# Altium PCB BOARD_2LAYER.PcbDoc (part 3 of 7)
Units mil, origin at the board's own origin, x right, y up, seen from the top; angles counter-clockwise.
Board outline 7677.17 x 7677.17 mil, 2 copper layers (Top Layer, Bottom Layer), stack 34.252 mil thick; 625 components, 375 nets, 1924 pads, 450 vias.
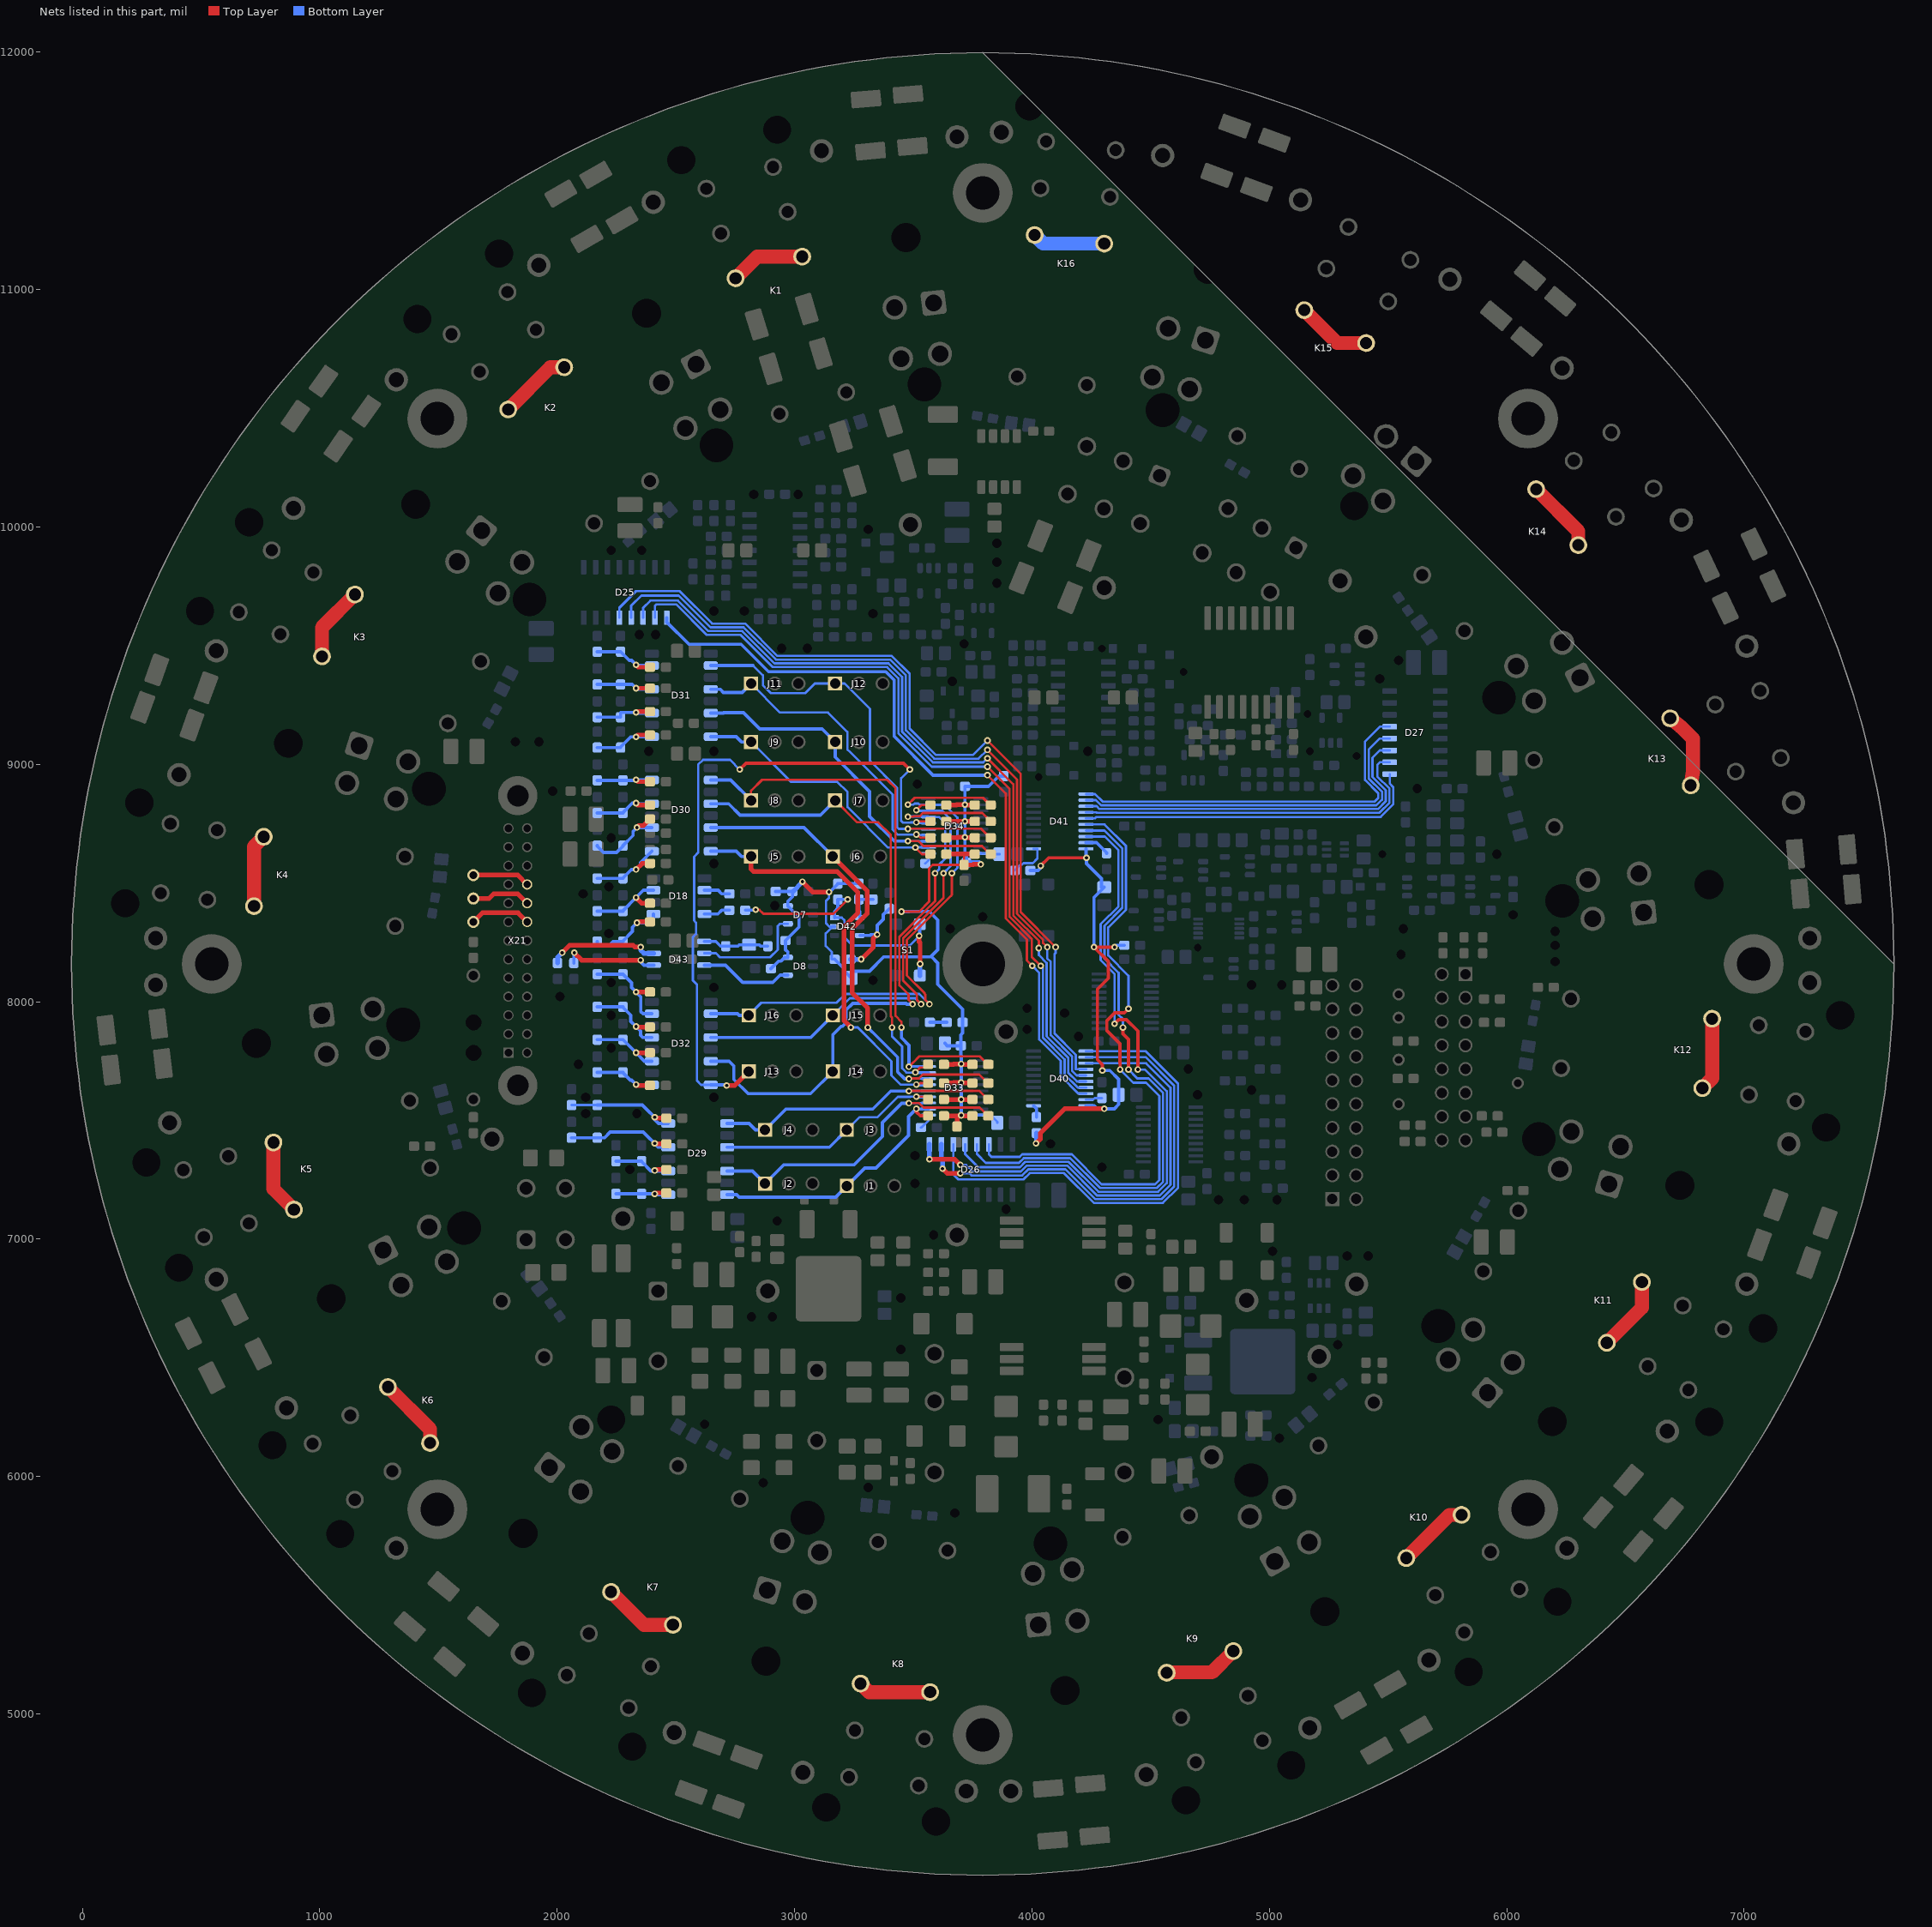
[diagram p3: the nets of this part, all layers, seen from the top]

## Components (designator, comment, footprint, x,y, rotation, side; value= is the part's Value field where it differs from the comment) (continued)
X2 "0039301040" 2Rx4K_ANGLE 2562.15,10551.18 r28 bottom locked
X3 "0039301040" 2Rx4K_ANGLE 1715.69,9852.36 r52 bottom locked
X4 "0039301040" 2Rx4K_ANGLE 1243.25,8966.54 r72 bottom locked
X5 "0039301040" 2Rx4K_ANGLE 1125.14,7874.02 r97 bottom locked
X6 "0039301040" 2Rx4K_ANGLE 1400.73,6929.13 r117 bottom locked
X7 "0039301040" 2Rx4K_ANGLE 2099.55,6072.83 r142 bottom locked
X8 "0039301040" 2Rx4K_ANGLE 2995.22,5600.39 r163 bottom locked
X9 "0039301040" 2Rx4K_ANGLE 4097.58,5492.13 r186 bottom locked
X10 "0039301040" 2Rx4K_ANGLE 5042.46,5777.56 r209 bottom locked
X11 "0039301040" 2Rx4K_ANGLE 5888.92,6486.22 r230 bottom locked
X12 "0039301040" 2Rx4K_ANGLE 6351.52,7342.52 r253 bottom locked
X13 "0039301040" 2Rx4K_ANGLE 6459.79,8444.88 r277 bottom locked
X14 "0039301040" 2Rx4K_ANGLE 6174.35,9389.76 r297 bottom locked
X15 "0039301040" 2Rx4K_ANGLE 5485.38,10246.06 r320 bottom locked
X16 "0039301040" 2Rx4K_ANGLE 4619.24,10708.66 r342 bottom locked
X17 "SBH11-PBPC-D10-ST-BK" IDS-20-V-2,54 5265.3,7168.9 r90 bottom
X18 "SBH11-PBPC-D08-ST-BK" IDS-16-V-2,54 5826.32,8116.54 r270 bottom locked
X19 "0039281063" 2Rx6K 4914.51,9901.57 r150 bottom locked
X20 "0039281063" 2Rx6K 4343.64,10177.17 r158 bottom
X21 "M80-5102642" M80-VERT-J-TEK-26 1833.8,8257.87 r270 bottom locked
X22 "0039281043" 2Rx4K 1951.91,7106.3 r0 bottom

## Footprints (in the part's own frame and the unit in brackets; to place one, negate y for a bottom-side part, rotate by r counter-clockwise, add the part's x,y. Pads: shape width x height; smd on the part's side, far side on the other; paste and mask are expansions set on the pad)
2Rx4K [mm]
  rrect39% 2x2 hole 1.4 paste-2539.97 mask+0.1: 1(-2.1,2.75)
  round 2 hole 1.4 paste-2539.97 mask+0.1: 2(2.1,2.75) 3(-2.1,-2.75) 4(2.1,-2.75)
  silkscreen extent -5,-6.25 5,4.9, body extent -5,-4.9 5,4.9, height 0.03
2Rx4K_ANGLE [mm]
  rrect28% 2.6x2.6 / inner rrect28% 2.8x2.8 / far side rrect30% 2.6x2.6 hole 1.8 paste-2539.97 mask+0.1: 1(2.1,-2.75)
  round 2.6 / inner round 2.8 / far side round 2.6 hole 1.8 paste-2539.97 mask+0.1: 2(-2.1,-2.75) 3(2.1,2.75) 4(-2.1,2.75)
  round 0 hole 3.1 unplated paste-2539.97 mask+0: ""(0,-10.05)
  silkscreen extent -5.05,-14.25 4.55,-3.8, body extent -5.05,-14.25 4.55,-3.8, height 0.03
2Rx6K [mm]
  rrect39% 2x2 hole 1.4 paste-2539.97 mask+0.1: 1(-4.2,2.75)
  round 2 hole 1.4 paste-2539.97 mask+0.1: 2(0,2.75) 3(4.2,2.75) 4(-4.2,-2.75) 5(0,-2.75) 6(4.2,-2.75)
  silkscreen extent -7.1,-6.25 7.1,4.9, body extent -7.1,-4.9 7.1,4.9, height 0.03
8-SOIC-VISHAY [mm]
  rrect44% 0.9x1.5 smd paste-0.05 mask+0.1: 1(-1.905,-2.73) 2(-0.635,-2.73) 3(0.635,-2.73) 4(1.905,-2.73) 5(1.905,2.73) 6(0.635,2.73) 7(-0.635,2.73) 8(-1.905,2.73)
  silkscreen extent -3.1,-4.6 3.1,2.1, body extent -3.1,-2.1 3.1,2.1, height 0.03
16-SOIC-7mm5W-Allegro [mm]
  rrect28% 0.7x2.5 smd paste-0.05 mask+0.1: 1(-4.445,-4.75) 2(-3.175,-4.75) 3(-1.905,-4.75) 4(-0.635,-4.75) 5(0.635,-4.75) 6(1.905,-4.75) 7(3.175,-4.75) 8(4.445,-4.75) 9(4.445,4.75) 10(3.175,4.75) 11(1.905,4.75) 12(0.635,4.75) 13(-0.635,4.75) 14(-1.905,4.75) 15(-3.175,4.75) 16(-4.445,4.75)
  silkscreen extent -6.31,-5.31 5.25,3.8, body extent -5.25,-3.8 5.25,3.8, height 0.03
16-SOIC-VISHAY [mm]
  rrect44% 0.9x1.5 smd paste-0.05 mask+0.1: 1(-4.445,-3.15) 2(-3.175,-3.15) 3(-1.905,-3.15) 4(-0.635,-3.15) 5(0.635,-3.15) 6(1.905,-3.15) 7(3.175,-3.15) 8(4.445,-3.15) 9(4.445,3.15) 10(3.175,3.15) 11(1.905,3.15) 12(0.635,3.15) 13(-0.635,3.15) 14(-1.905,3.15) 15(-3.175,3.15) 16(-4.445,3.15)
  silkscreen extent -6.7,-3.95 5.2,2.3, body extent -5.2,-2.3 5.2,2.3, height 0.03
0603-STANDART-1608 [mm]
  rrect40% 1.1x1 smd paste-0.05 mask+0.1: 1(-0.85,0) 2(0.85,0)
  silkscreen extent -0.85,-0.47 0.85,0.48, body extent -0.85,-0.47 0.85,0.48, height 0.03
0805-STANDART-2012 [mm]
  rrect30% 1.3x1.5 smd paste-0.05 mask+0.1: 1(-0.95,0) 2(0.95,0)
  silkscreen extent -1.08,-0.7 1.07,0.7, body extent -1.08,-0.7 1.07,0.7, height 0.03
0805-STANDART-2012-SVET [mm]
  rrect30% 1.3x1.5 smd paste-0.05 mask+0.1: 1(-0.95,0) 2(0.95,0)
  silkscreen extent -1.08,-0.75 2,0.75, body extent -1.08,-0.7 1.07,0.7, height 0.03
1206-STANDART-3216 [mm]
  rrect25% 1.6x1.8 smd paste-0.05 mask+0.1: 1(-1.4,0) 2(1.4,0)
  silkscreen extent -1.68,-0.88 1.67,0.87, body extent -1.68,-0.88 1.67,0.87, height 0.03
1210-STANDART-3225 [mm]
  rrect25% 1.6x2.7 smd paste-0.05 mask+0.1: 1(-1.4,0) 2(1.4,0)
  silkscreen extent -1.68,-1.32 1.67,1.32, body extent -1.68,-1.32 1.67,1.32, height 0.03
1808-STANDART-4520 [mm]
  rrect22% 1.75x2.3 smd paste-0.1 mask+0.1: 1(-2.3,0) 2(2.3,0)
  silkscreen extent -2.6,-1.1 2.6,1.1, body extent -2.6,-1.1 2.6,1.1, height 0.03
2512-STANDART-6332 [mm]
  rrect22% 1.8x3.2 smd paste-0.05 mask+0.1: 1(-2.8,0) 2(2.8,0)
  silkscreen extent -3.23,-1.7 3.22,1.7, body extent -3.23,-1.7 3.22,1.7, height 0.03
6540_SRP_SERIES_7t5x6t5_H4 [mm]
  rrect16% 2.4x4 smd paste-0.05 mask+0.1: 1(-2.775,0) 2(2.775,0)
  silkscreen extent -3.75,-3.35 3.75,3.35, body extent -3.75,-3.35 3.75,3.35, height 0.03
7914G [mm]
  rrect31% 1.27x1.27 smd paste-0.05 mask+0.1: 1(-2.75,-1.27) 2(2.75,-1.27) 3(2.75,1.27) 4(-2.75,1.27)
  silkscreen extent -2.25,-2.5 2.25,2.5, body extent -2.25,-2.5 2.25,2.5, height 0.03
CAP-EL-L7.5-D18,0 [mm]
  rrect39% 2x2 hole 1.4 paste-2539.97 mask+0.1: 1(-3.75,0)
  round 2 hole 1.4 paste-2539.97 mask+0.1: 2(3.75,0)
  silkscreen extent -11.25,-9.25 9.25,9.25, body extent -9.25,-9.25 9.25,9.25, height 0.03
D_R_PDSO-G16 [mm]
  rrect33% 0.6x1.55 smd paste-0.05 mask+0.1: 1(-4.445,-2.7) 2(-3.175,-2.7) 3(-1.905,-2.7) 4(-0.635,-2.7) 5(0.635,-2.7) 6(1.905,-2.7) 7(3.175,-2.7) 8(4.445,-2.7) 9(4.445,2.7) 10(3.175,2.7) 11(1.905,2.7) 12(0.635,2.7) 13(-0.635,2.7) 14(-1.905,2.7) 15(-3.175,2.7) 16(-4.445,2.7)
  silkscreen extent -6.31,-3.56 5,2, body extent -5,-2 5,2, height 0.03
D_R_PDSO_G14 [mm]
  rrect33% 0.6x1.55 smd paste-0.05 mask+0.1: 1(-3.81,-2.7) 2(-2.54,-2.7) 3(-1.27,-2.7) 4(0,-2.7) 5(1.27,-2.7) 6(2.54,-2.7) 7(3.81,-2.7) 8(3.81,2.7) 9(2.54,2.7) 10(1.27,2.7) 11(0,2.7) 12(-1.27,2.7) 13(-2.54,2.7) 14(-3.81,2.7)
  silkscreen extent -4.38,-4.55 4.38,2, body extent -4.38,-2 4.38,2, height 0.03
DBV_R-PDSO-G6 [mm]
  rrect36% 0.55x1 smd paste-0.05 mask+0.05: 1(-0.95,-1.35) 2(0,-1.35) 3(0.95,-1.35) 4(0.95,1.35) 5(0,1.35) 6(-0.95,1.35)
  silkscreen extent -2,-1.5 1.53,0.87, body extent -1.52,-0.87 1.53,0.87, height 0.03
DPAK-3-TO252-ONSEMI [mm]
  rrect25% 1.6x3 smd paste-0.05 mask+0.1: 1(-2.3,0) 3(2.3,0)
  rrect14% 7x7 smd paste-0.1 mask+0.1: 4(0,6.9)
  silkscreen extent -3.75,3 3.75,10.75, body extent -3.35,2.85 3.35,9.05, height 0.03
DVB-R-PDSO-G12/G28 [mm]
  rrect22% 0.9x2.5 smd paste-0.05 mask+0.1: 1(-8.04,-4.4) 2(-6.78,-4.4) 3(-5.5,-4.4) 12(5.5,-4.4) 13(6.78,-4.4) 14(8.04,-4.4) 15(8.04,4.4) 16(6.78,4.4) 17(5.5,4.4) 26(-5.5,4.4) 27(-6.78,4.4) 28(-8.04,4.4)
  silkscreen extent -10.65,-6.15 9.05,3.8, body extent -9.05,-3.8 9.05,3.8, height 0.03
IDS-16-V-2,54 [mm]
  rrect0% 1.5x1.5 hole 1.1 paste-2539.97 mask+0.1: 1(0,0)
  round 1.5 hole 1.1 paste-2539.97 mask+0.1: 2(0,2.54) 3(2.54,0) 4(2.54,2.54) 5(5.08,0) 6(5.08,2.54) 7(7.62,0) 8(7.62,2.54) 9(10.16,0) 10(10.16,2.54) 11(12.7,0) 12(12.7,2.54) 13(15.24,0) 14(15.24,2.54) 15(17.78,0) 16(17.78,2.54)
  silkscreen extent -5.21,-3.38 22.99,5.92, body extent -5.21,-3.38 22.99,5.92, height 0.03
IDS-20-V-2,54 [mm]
  rrect0% 1.5x1.5 hole 1.1 paste-2539.97 mask+0.1: 1(0,0)
  round 1.5 hole 1.1 paste-2539.97 mask+0.1: 2(0,2.54) 3(2.54,0) 4(2.54,2.54) 5(5.08,0) 6(5.08,2.54) 7(7.62,0) 8(7.62,2.54) 9(10.16,0) 10(10.16,2.54) 11(12.7,0) 12(12.7,2.54) 13(15.24,0) 14(15.24,2.54) 15(17.78,0) 16(17.78,2.54) 17(20.32,0) 18(20.32,2.54) 19(22.86,0) 20(22.86,2.54)
  silkscreen extent -5.17,-3.38 28.03,5.92, body extent -5.17,-3.38 28.03,5.92, height 0.03
M80-VERT-J-TEK-26 [mm]
  rrect0% 1.1x1.1 hole 0.8 paste-2539.97 mask+0.1: 1(12,1)
  round 1.1 hole 0.8 paste-2539.97 mask+0.05: 2(10,1) 3(8,1) 4(6,1) 5(4,1) 6(2,1) 7(0,1) 8(-2,1) 9(-4,1) 10(-6,1) 11(-8,1) 12(-10,1) 13(-12,1) 14(12,-1) 15(10,-1) 16(8,-1) 17(6,-1) 18(4,-1) 19(2,-1) 20(0,-1) 21(-2,-1) 22(-4,-1) 23(-6,-1) 24(-8,-1) 25(-10,-1) 26(-12,-1)
  round 4.2 / inner round 4.4 / far side round 4.2 hole 2.3 paste-2539.97 mask-2.1: ""(-15.5,0) ""(15.5,0)
  silkscreen extent -18,-3.05 18,3.05, body extent -18,-3.05 18,3.05, height 0.03
MGSHV-0_2-D1_6xd0_62_d1_7 [mm]
  round 1.5 hole 1 paste-2539.97 mask+0.05: 1(0,0)
  round 0 hole 1.7 unplated paste-2539.97 mask+0: ""(5,0)
  silkscreen extent -1,-1 1,1, body extent -1,-1 1,1, height 0.03
MGSHV-0_12-D1_3xd0_45 [mm]
  round 1.3 hole 0.8 paste-2539.97 mask+0.05: 1(0,0)
  silkscreen extent -1,-1 1,1, body extent -1,-1 1,1, height 0.03
MSOP-RM-10-AD [mm]
  rrect58% 0.34x1.04 smd paste-0.05 mask-0.52: 1(-1,-2.2) 2(-0.5,-2.2) 3(0,-2.2) 4(0.5,-2.2) 5(1,-2.2) 6(1,2.2) 7(0.5,2.2) 8(0,2.2) 9(-0.5,2.2) 10(-1,2.2)
  silkscreen extent -1.88,-3.52 1.5,1.5, body extent -1.5,-1.5 1.5,1.5, height 0.03
PLS-3-2,54 [mm]
  rrect0% 1.5x1.5 hole 1.1 paste-2539.97 mask+0.1: 1(-2.54,0)
  round 1.5 hole 1.1 paste-2539.97 mask+0.1: 2(0,0) 3(2.54,0)
  silkscreen extent -3.8,-2.5 3.8,2.5, body extent -3.8,-2.5 3.8,2.5, height 0.03
PW-R-PDSO-G20 [mm]
  rrect57% 0.35x1.6 smd paste-0.05 mask+0.075: 1(-2.925,-2.8) 2(-2.275,-2.8) 3(-1.625,-2.8) 4(-0.975,-2.8) 5(-0.325,-2.8) 6(0.325,-2.8) 7(0.975,-2.8) 8(1.625,-2.8) 9(2.275,-2.8) 10(2.925,-2.8) 11(2.925,2.8) 12(2.275,2.8) 13(1.625,2.8) 14(0.975,2.8) 15(0.325,2.8) 16(-0.325,2.8) 17(-0.975,2.8) 18(-1.625,2.8) 19(-2.275,2.8) 20(-2.925,2.8)
  silkscreen extent -3.55,-4.5 3.3,2.25, body extent -3.3,-2.25 3.3,2.25, height 0.03
PW-R-PDSO-G20-TI [mm]
  rrect66% 0.3x1.6 smd paste-2539.97 mask+0.075: 1(-2.925,-2.8) 2(-2.275,-2.8) 3(-1.625,-2.8) 4(-0.975,-2.8) 5(-0.325,-2.8) 6(0.325,-2.8) 7(0.975,-2.8) 8(1.625,-2.8) 9(2.275,-2.8) 10(2.925,-2.8) 11(2.925,2.8) 12(2.275,2.8) 13(1.625,2.8) 14(0.975,2.8) 15(0.325,2.8) 16(-0.325,2.8) 17(-0.975,2.8) 18(-1.625,2.8) 19(-2.275,2.8) 20(-2.925,2.8)
  silkscreen extent -3.55,-4.45 3.3,2.25, body extent -3.3,-2.25 3.3,2.25, height 0.03
RT-2-TE-YNIVERSAL [mm]
  round 1.9 hole 1.3 paste-2539.97 mask+0.05: 11(7.56,-3.75) 12(2.52,-3.75) 14(12.6,-3.75) 21(7.56,3.75) 22(2.52,3.75) 24(12.6,3.75) A1(-12.74,-3.75) A2(-12.74,3.75)
  silkscreen extent -14.71,-9.09 14.5,6.35, body extent -14.5,-6.35 14.5,6.35, height 0.03
RTVSxP1UP [mm]
  rrect28% 1.4x2.1 smd paste-0.1 mask+0.1: 1(-2.2,0) 2(2.2,0)
  silkscreen extent -3.5,-1.35 2,1.35, body extent -2,-1.35 2,1.35, height 0.03
SC-70-KS-6-AD [mm]
  rrect50% 0.4x1 smd paste-0.05 mask+0.05: 1(-0.65,-0.95) 2(0,-0.95) 3(0.65,-0.95) 4(0.65,0.95) 5(0,0.95) 6(-0.65,0.95)
  silkscreen extent -1.3,-2 1.1,0.7, body extent -1.1,-0.7 1.1,0.7, height 0.03
SMB-ST [mm]
  rrect17% 2.3x2.5 smd paste-0.05 mask+0.1: 1(-2.15,0) 2(2.15,0)
  silkscreen extent -3.75,-2 2.3,2, body extent -2.3,-2 2.3,2, height 0.03
SOD123-DIODES [mm]
  rrect22% 0.9x0.95 smd paste-0.05 mask+0.05: 1(-1.575,0) 2(1.575,0)
  silkscreen extent -1.45,-0.85 1.45,0.85, body extent -1.45,-0.85 1.45,0.85, height 0.03
SOD323F_SC90 [mm]
  rrect25% 1x0.8 smd paste-0.05 mask+0.1: 1(-1.1,0) 2(1.1,0)
  silkscreen extent -2,-0.7 0.9,0.7, body extent -0.9,-0.7 0.9,0.7, height 0.03
SOIC-8-SIL-LAB-NB [mm]
  rrect66% 0.6x1.55 smd paste-0.05 mask+0.1: 1(-1.905,-2.7) 2(-0.635,-2.7) 3(0.635,-2.7) 4(1.905,-2.7) 5(1.91,2.7) 6(0.635,2.7) 7(-0.635,2.7) 8(-1.905,2.7)
  silkscreen extent -3.37,-2.88 2.5,2, body extent -2.5,-2 2.5,2, height 0.03
SOT-23-DBV-R-PDSO-G5-TI [mm]
  rrect66% 0.6x1.1 smd paste-0.05 mask+0.1: 1(-0.95,-1.35) 2(0,-1.35) 3(0.95,-1.35) 4(0.95,1.35) 5(-0.95,1.35)
  silkscreen extent -1.55,-0.9 1.55,0.9, body extent -1.55,-0.9 1.55,0.9, height 0.03
SOT-23-RT-3-AD [mm]
  rrect36% 0.55x1 smd paste-0.05 mask+0.05: 1(-0.95,-1.2) 2(0.95,-1.2) 3(0,1.2)
  silkscreen extent -1.5,-0.7 1.5,0.7, body extent -1.5,-0.7 1.5,0.7, height 0.03
SR0905 [mm]
  rrect25% 3x1.6 smd paste-0.05 mask+0.1: 1(-4,1.27) 2(-4,-1.27) 3(4,-1.27) 4(4,1.27)
  silkscreen extent -5.56,-3.15 4.75,4.56, body extent -4.75,-3.15 4.75,3.15, height 0.03
TEST-POINTS-1 [mm]
  round 2.5 hole 1.6 paste-2539.97 mask+0.05: 1(0,0)
  silkscreen extent -1.6,-1.6 1.6,1.6, body extent -1.6,-1.6 1.6,1.6, height 0.03
THN-30 [mm]
  round 2.1 hole 1.5 paste-2539.97 mask+0.05: 1(-10.16,-2.54) 2(-10.16,2.54) 3(10.16,-10.16) 4(10.16,0) 5(10.16,10.16) 6(-10.16,10.16)
  silkscreen extent -13,-13 13,13, body extent -13,-13 13,13, height 0.03

## Free pads (board coordinates)
  round 0 hole 118.11 unplated paste-99999 mask+0: ""(180.26,8415.35) ""(239.31,8838.58) ""(268.84,7322.83) ""(406.64,6879.92) ""(495.22,9645.67) ""(701.91,10019.68) ""(800.34,6131.89) ""(1085.77,5757.87) ""(1410.57,10875.98) ""(1755.06,11151.57) ""(1892.86,5088.58) ""(2227.5,6240.16) ""(2316.09,4862.2) ""(2522.78,11545.28) ""(2926.32,11673.23) ""(3133.01,4606.3) ""(3595.61,4547.24) ""(3989.31,11771.65) ""(4461.76,11712.6) ""(4648.76,4635.83) ""(5091.68,4783.46) ""(5327.9,11427.17) ""(5357.42,10088.58) ""(5751.13,11200.79) ""(5839.71,5177.17) ""(6213.72,5472.44) ""(6499.16,10551.18) ""(6774.75,10187.01) ""(6853.49,6230.31) ""(7079.87,6624.02) ""(7168.45,9448.82) ""(7306.24,8996.06) ""(7345.61,7470.47) ""(7404.67,7942.91)
  round 251.97 hole 141.73 paste-99999 mask+7.87: ""(544.43,8159.45) ""(1495.22,5862.2) ""(1495.22,10456.69) ""(3792.46,4911.42) ""(3792.46,11407.48) ""(6089.71,5862.2) ""(6089.71,10456.69) ""(7040.5,8159.45)
  round 0 hole 141.73 unplated paste-99999 mask+0: ""(1351.52,7903.54) ""(1459.79,8897.64) ""(1607.42,7047.24) ""(1883.01,9694.88) ""(2670.42,10344.49) ""(3054.27,5826.77) ""(3546.4,10600.39) ""(4077.9,5718.5) ""(4550.34,10492.13) ""(4924.35,5984.25) ""(5711.76,6633.86) ""(5967.66,9281.5) ""(6134.98,7421.26) ""(6233.41,8425.2)
  round 0 hole 39.37 unplated paste-99999 mask+0: ""(1823.96,9094.49) ""(1922.38,9094.49) ""(1981.44,8887.8) ""(2010.97,8021.65) ""(2089.71,7736.22) ""(2109.39,8454.72) ""(2119.24,7529.53) ""(2119.24,7598.43) ""(2217.66,8287.4) ""(2217.66,8484.25) ""(2227.5,7805.12) ""(2227.5,7942.91) ""(2227.5,8080.71) ""(2227.5,8690.94) ""(2227.5,9901.57) ""(2306.24,7293.31) ""(2335.77,7529.53) ""(2345.61,9547.24) ""(2355.46,9901.57) ""(2384.98,9055.12) ""(2414.51,9547.24) ""(2621.2,6220.47) ""(2660.57,7598.43) ""(2660.57,8061.02) ""(2660.57,8582.68) ""(2660.57,9055.12) ""(2660.57,9645.67) ""(2788.53,9645.67) ""(2818.05,6673.23) ""(2827.9,10137.8) ""(2867.27,5974.41) ""(2906.64,6673.23) ""(2916.48,8405.51) ""(2926.32,7076.77) ""(2946.01,9488.19) ""(3014.9,10137.8) ""(3054.27,9488.19) ""(3310.18,5954.72) ""(3310.18,9990.16) ""(3329.87,8090.55) ""(3329.87,9635.83) ""(3447.98,6535.43) ""(3447.98,6751.97) ""(3507.03,7234.25) ""(3507.03,7352.36) ""(3516.87,8917.32) ""(3585.77,7017.72) ""(3654.67,8307.09) ""(3664.51,9350.39) ""(3674.35,5846.46) ""(3713.72,9507.87) ""(3792.46,8358.43) ""(3851.52,9763.78) ""(3851.52,9852.36) ""(3851.52,9931.1) ""(3890.89,7125.98) ""(3979.47,7883.86) ""(3979.47,7972.44) ""(4077.9,7401.57) ""(4136.95,7952.76) ""(4196.01,7854.33) ""(4235.38,9055.12) ""(4294.43,7303.15) ""(4530.65,6240.16) ""(4658.61,7716.54) ""(4697.98,7608.27) ""(4786.56,7165.35) ""(4894.83,7165.35) ""(4924.35,7627.95) ""(4924.35,8070.87) ""(5012.94,6948.82) ""(5032.62,7165.35) ""(5042.46,6161.42) ""(5052.31,8070.87) ""(5180.26,6417.32) ""(5288.53,6555.12) ""(5327.9,6929.13) ""(5416.48,6929.13) ""(5465.69,9360.24) ""(5544.43,9438.98) ""(5554.27,8198.82) ""(5564.12,8307.09) ""(5623.17,8897.64) ""(5957.82,8622.05) ""(6026.72,8366.14) ""(6203.88,8169.29) ""(6203.88,8238.19) ""(6203.88,8297.24)
  round 338.58 hole 188.98 paste-99999 mask-169.29: ""(3792.46,8159.45)
  round 0 hole 31.5 unplated paste-99999 mask+0: ""(4028.68,8946.85) ""(4294.43,9488.19) ""(4638.92,9389.76) ""(4697.98,8228.35) ""(5160.57,9212.6) ""(5170.42,9055.12) ""(5367.27,9035.43) ""(5475.53,8622.05)

## Via types
v1: diameter 27.56/27.56 (per signal layer), hole 13.78, Top Layer to Bottom Layer, 447 vias
v2: diameter 78.74, hole 55.12, Top Layer to Bottom Layer, 2 vias
v3: diameter 35.43/35.43 (per signal layer), hole 19.68, Top Layer to Bottom Layer, 1 vias

## Nets (pads, with @x,y where several pads share a name; then routed paths per layer and width w, separated by ;. In a path a pad name is that pad's centre, name@x,y a point inside that pad or via, vN(x,y) a via of type N, cw(c..) or ccw(c..) an arc to the next point about the centre after c; other vN are vias at no path point)
$1N7568: C117.1 D29.1 R62.1 R108.2 | length 272.9
  Top Layer w19.68: v1(2410.57,7190.94) 2414.51,7194.88 R108.2@2459.79,7194.88
  Bottom Layer w13.78: C117.1@2247.19,7190.94 R62.1@2355.46,7190.94 v1(2410.57,7190.94) 2423.57,7190.94 2427.31,7187.2 D29.1@2467.66,7187.2
$1N7571: C118.1 D29.3 R63.1 R109.2 | length 291.8
  Top Layer w19.68: v1(2410.57,7289.37) 2414.51,7293.31 R109.2@2459.79,7293.31
  Bottom Layer w13.78: C118.1@2247.19,7328.74 R63.1@2355.46,7328.74 2355.46,7326.77 2395.02,7287.2 v1@2410.57,7287.2 ; v1(2410.57,7289.37) v1@2410.57,7287.2 ; D29.3@2467.66,7287.2 v1@2410.57,7287.2
$1N7573: C119.1 D29.5 R64.1 R110.2 | length 494.7
  Top Layer w19.68: v1(2410.57,7403.54) 2412.54,7401.57 R110.2@2459.79,7401.57
  Bottom Layer w13.78: C119.1@2060.18,7427.17 R64.1@2168.45,7427.17 2198.96,7427.17 2222.81,7451.01 2362.13,7451.01 2390.8,7422.33 2391.78,7422.33 v1(2410.57,7403.54) 2410.57,7401.97 2425.34,7387.2 D29.5@2467.66,7387.2
$1N7575: C120.1 D29.7 R65.1 R111.2 | length 496.3
  Top Layer w19.68: v1(2410.57,7513.78) 2414.51,7509.84 R111.2@2459.79,7509.84
  Bottom Layer w9.84: C120.1@2060.18,7564.96 R65.1@2168.45,7564.96
  Bottom Layer w13.78: R65.1@2168.45,7564.96 2358.67,7564.96 2391.06,7532.57 2391.78,7532.57 v1(2410.57,7513.78) 2410.57,7503.94 2427.31,7487.2 D29.7@2467.66,7487.2
$1N7577: C121.1 D30.1 R66.1 R112.2 | length 354.4
  Top Layer w19.68: v1(2331.83,8557.09) 2357.42,8582.68 R112.2@2390.89,8582.68
  Bottom Layer w13.78: C121.1@2168.45,8519.68 R66.1@2276.72,8519.68 2276.72,8521.65 2312.15,8557.09 v1(2331.83,8557.09) 2350.63,8575.88 2350.63,8585.92 D30.1@2398.76,8634.06
$1N7580: C122.1 D30.3 R67.1 R113.2 | length 368.2
  Top Layer w19.68: v1(2335.77,8734.25) 2342.69,8741.17 2362.37,8741.17 R113.2@2390.89,8769.68
  Bottom Layer w13.78: C122.1@2168.45,8657.48 2168.45,8655.51 2194.87,8629.09 2250.29,8629.09 2276.72,8655.51 R67.1@2276.72,8657.48 2319.6,8700.37 2319.6,8718.09 v1(2335.77,8734.25) 2335.97,8734.06 D30.3@2398.76,8734.06
$1N7582: C123.1 D30.5 R68.1 R114.2 | length 312
  Top Layer w19.68: v1(2331.83,8836.61) 2339.71,8828.74 R114.2@2390.89,8828.74
  Bottom Layer w13.78: C123.1@2168.45,8795.28 R68.1@2276.72,8795.28 2276.72,8797.24 2316.09,8836.61 v1(2331.83,8836.61) 2334.39,8834.06 D30.5@2398.76,8834.06
$1N7584: C124.1 D30.7 R69.1 R115.2 | length 295
  Top Layer w19.68: v1(2331.83,8935.04) 2339.71,8927.17 R115.2@2390.89,8927.17
  Bottom Layer w13.78: C124.1@2168.45,8933.07 R69.1@2276.72,8933.07 v1@2331.83,8933.07 ; v1(2331.83,8935.04) v1@2331.83,8933.07 ; D30.7@2398.76,8934.06 2332.82,8934.06 v1@2331.83,8933.07
$1N7586: D31.10 D34.5 J12.1 R54.1 | length 1851.2
  Top Layer w9.84: v1(3477.5,8728.35) 3478.49,8729.33 3785.57,8729.33 3823.96,8690.94 R54.1@3825.93,8690.94
  Bottom Layer w9.84: 2825.01,9416.34 2866.48,9374.87 2866.48,9333.48 2899.76,9300.2 3044.85,9300.2 3085.2,9340.55 J12.1@3170.81,9340.55 3211.16,9340.55 3317.59,9234.12 3317.59,9015.27 3431.86,8901.01 3431.86,8735.31 3438.82,8728.35 v1(3477.5,8728.35) 3478.49,8729.33 3562.15,8729.33 D34.5@3564.12,8727.36
  Bottom Layer w13.78: D31.10@2646.79,9416.34 2825.01,9416.34
$1N7587: D31.12 D34.4 J11.1 R53.1 | length 1397.9
  Top Layer w9.84: v1(3512.94,8704.72) 3516.39,8704.72 3530.17,8690.94 R53.1@3571.99,8690.94
  Bottom Layer w9.84: J11.1@2816.48,9340.55 2938.44,9218.59 3140.69,9218.59 3222.38,9136.9 3222.38,9063.24 3232.49,9053.14 3413.32,8872.31 3413.32,8724.61 3434.19,8703.74 3511.95,8703.74 v1(3512.94,8704.72) 3515.89,8701.77 D34.4@3564.12,8701.77
  Bottom Layer w13.78: D31.12@2646.79,9316.34 2687.15,9316.34 2700.12,9303.37 2779.3,9303.37 J11.1@2816.48,9340.55
$1N7588: D31.14 D34.3 J10.1 R52.1 | length 1611.7
  Top Layer w9.84: v1(3477.5,8677.17) 3521.68,8677.17 3542.35,8656.5 3789.51,8656.5 3823.96,8622.05 R52.1@3825.93,8622.05
  Bottom Layer w9.84: v1(3477.5,8677.17) 3520.81,8677.17 3521.79,8676.18 D34.3@3564.12,8676.18
  Bottom Layer w13.78: D31.14@2646.79,9216.34 2699.95,9216.34 2701.07,9217.45 2784.51,9217.45 2852.74,9149.22 3116.08,9149.22 J10.1@3170.81,9094.49 3170.81,9030.98 3315.93,8885.86 3315.93,8781.23 3419.99,8677.17 v1(3477.5,8677.17)
$1N7589: D31.16 D34.2 J9.1 R51.1 | length 1222.3
  Top Layer w9.84: v1(3509,8649.61) 3536.56,8622.05 R51.1@3571.99,8622.05
  Bottom Layer w9.84: J9.1@2816.48,9094.49 2984.05,8926.92 3179.06,8926.92 3222.73,8883.25 3222.73,8820.41 3393.54,8649.61 v1(3509,8649.61) 3509.98,8650.59 D34.2@3564.12,8650.59
  Bottom Layer w13.78: D31.16@2646.79,9116.34 2754.27,9116.34 2776.13,9094.49 J9.1@2816.48,9094.49
$1N7590: C125.1 D31.1 R70.1 R116.2 | length 312.6
  Top Layer w19.68: v1(2331.83,9116.14) 2339.71,9124.02 R116.2@2390.89,9124.02
  Bottom Layer w13.78: C125.1@2168.45,9070.87 R70.1@2266.87,9070.87 2266.87,9072.83 2310.18,9116.14 v1(2331.83,9116.14) 2332.03,9116.34 D31.1@2398.76,9116.34
$1N7593: C126.1 D31.3 R71.1 R117.2 | length 312.9
  Top Layer w19.68: v1(2331.83,9218.5) 2335.77,9222.44 R117.2@2390.89,9222.44
  Bottom Layer w13.78: C126.1@2168.45,9198.82 R71.1@2266.87,9198.82 2266.87,9218.5 v1(2331.83,9218.5) 2331.83,9216.34 D31.3@2398.76,9216.34
$1N7595: C127.1 D31.5 R72.1 R118.2 | length 297.8
  Top Layer w19.68: v1(2331.83,9320.87) R118.2@2390.89,9320.87
  Bottom Layer w13.78: R72.1@2168.45,9336.61 C127.1@2266.87,9336.61 2316.09,9336.61 v1(2331.83,9320.87) 2336.36,9316.34 D31.5@2398.76,9316.34
$1N7597: C128.1 D31.7 R73.1 R119.2 | length 319.2
  Top Layer w19.68: v1(2331.83,9419.29) 2341.68,9409.45 R119.2@2390.89,9409.45
  Bottom Layer w13.78: R73.1@2168.45,9474.41 C128.1@2266.87,9474.41 2303.2,9438.08 2313.04,9438.08 v1(2331.83,9419.29) 2331.83,9416.34 D31.7@2398.76,9416.34
$1N7599: D32.10 D34.9 J16.1 R58.1 | length 2500.4
  Top Layer w9.84: v1(3477.5,8830.71) 3506.05,8859.25 3793.45,8859.25 3823.96,8828.74 R58.1@3825.93,8828.74 ; v1(3568.05,7990.16) 3550.66,8007.56 3550.66,8031.18 3546.72,8035.12 3546.72,8037.47 3473.12,8111.06 3473.12,8260.74 3658.61,8446.22 3658.61,8446.46 3662.54,8450.4 v1(3662.54,8541.34)
  Bottom Layer w9.84: J16.1@2806.64,7942.91 2859.58,7995.86 3176.79,7995.86 3214.23,8033.29 3524.92,8033.29 v1(3568.05,7990.16) ; v1(3477.5,8830.71) 3500.9,8830.71 3505.21,8835.02 3521.79,8835.02 3527.09,8829.72 D34.9@3564.12,8829.72 3632.34,8829.72 3685.97,8776.09 3685.97,8564.77 v1(3662.54,8541.34)
  Bottom Layer w13.78: D32.10@2646.79,7949.8 2759.39,7949.8 2766.28,7942.91 J16.1@2806.64,7942.91
$1N7600: D32.12 D34.8 J15.1 R57.1 | length 2085.2
  Top Layer w9.84: v1(3512.94,8807.09) 3534.59,8828.74 R57.1@3571.99,8828.74 ; v1(3532.62,7990.16) 3515.22,8007.56 3515.22,8031.18 3457.38,8089.02 3457.38,8267.26 3623.17,8433.05 3623.17,8433.3 3627.11,8437.23 v1(3627.11,8541.34)
  Bottom Layer w9.84: J15.1@3160.97,7942.91 3232.82,8014.76 3508.01,8014.76 v1(3532.62,7990.16) ; v1(3512.94,8807.09) 3515.89,8804.13 D34.8@3564.12,8804.13 3621.77,8804.13 3657.38,8768.52 3657.38,8571.61 v1(3627.11,8541.34)
  Bottom Layer w13.78: D32.12@2646.79,7849.8 3067.86,7849.8 J15.1@3160.97,7942.91
$1N7601: D32.14 D34.7 J14.1 R56.1 | length 2625.7
  Top Layer w9.84: v1(3477.5,8779.53) 3500.14,8779.53 3502.11,8781.5 3526.26,8781.5 3540.08,8795.32 3790.45,8795.32 R56.1@3825.93,8759.84 ; v1(3497.19,7990.16) 3479.79,8007.56 3479.79,8031.18 3441.63,8069.34 3441.63,8274.02 3563.27,8395.67 3574.83,8407.22 3591.68,8424.07 v1(3591.68,8541.34)
  Bottom Layer w9.84: v1(3477.5,8779.53) 3478.49,8780.51 3562.15,8780.51 D34.7@3564.12,8778.54 3608.63,8778.54 3634.6,8752.57 3634.6,8603.23 3609.08,8577.7 3609.08,8558.74 v1(3591.68,8541.34)
  Bottom Layer w13.78: D32.14@2646.79,7749.8 2724.1,7749.8 2744.16,7729.75 2744.16,7672.78 2804.12,7612.82 3067.09,7612.82 J14.1@3160.97,7706.69 3160.97,7861.18 3196.44,7896.65 3201.5,7896.65 3217.07,7912.22 3217.07,7965.93 3244.66,7993.52 3469.22,7993.52 3472.58,7990.16 v1(3497.19,7990.16)
$1N7602: D32.16 D34.6 J13.1 R55.1 | length 2956.5
  Top Layer w9.84: v1(3512.94,8755.91) 3516.87,8759.84 R55.1@3571.99,8759.84
  Top Layer w13.78: v1(2768.84,8978.35) 2795.38,9004.89 3458.84,9004.89 v1(3485.38,8978.35)
  Top Layer w19.68: v1(2713.72,7647.64) 2747.58,7647.64 J13.1@2806.64,7706.69
  Bottom Layer w9.84: D32.16@2646.79,7649.8 2606.44,7649.8 2588.72,7667.52 2588.72,8072.58 2571.31,8089.99 2571.31,8272.31 2584.79,8285.78 2584.79,8333.41 2576.65,8341.55 2576.65,8611.21 2593.56,8628.12 2593.56,8998.68 2614.17,9019.3 2727.89,9019.3 v1(2768.84,8978.35) ; v1(3485.38,8978.35) 3448.71,8941.68 3448.71,8761.88 3455.67,8754.92 3488.33,8754.92 3489.31,8755.91 v1(3512.94,8755.91) 3515.89,8752.95 D34.6@3564.12,8752.95
  Bottom Layer w13.78: D32.16@2646.79,7649.8 2711.56,7649.8 v1(2713.72,7647.64)
$1N7603: C129.1 D32.1 R74.1 R120.2 | length 314.1
  Top Layer w19.68: v1(2331.83,7651.57) 2335.77,7647.64 R120.2@2390.89,7647.64
  Bottom Layer w13.78: C129.1@2168.45,7702.76 R74.1@2276.72,7702.76 2276.72,7700.79 2307.14,7670.37 2313.04,7670.37 v1(2331.83,7651.57) 2333.61,7649.8 D32.1@2398.76,7649.8
$1N7606: C130.1 D32.3 R75.1 R121.2 | length 327
  Top Layer w19.68: v1(2331.83,7785.43) R121.2@2390.89,7785.43
  Bottom Layer w13.78: C130.1@2168.45,7840.55 R75.1@2276.72,7840.55 v1(2331.83,7785.43) 2367.46,7749.8 D32.3@2398.76,7749.8
$1N7608: C131.1 D32.5 R76.1 R122.2 | length 369.7
  Top Layer w19.68: v1(2331.83,7895.67) 2333.8,7893.7 R122.2@2390.89,7893.7
  Bottom Layer w13.78: C131.1@2168.45,7978.35 R76.1@2276.72,7978.35 2276.72,7976.38 2309.59,7943.5 2309.59,7917.91 v1(2331.83,7895.67) 2350.63,7876.88 2350.63,7859.55 2360.37,7849.8 D32.5@2398.76,7849.8
$1N7610: C132.1 D32.7 R77.1 R123.2 | length 406.1
  Top Layer w19.68: v1(2331.83,8041.34) R123.2@2390.89,8041.34
  Bottom Layer w13.78: C132.1@2168.45,8116.14 R77.1@2276.72,8116.14 2313.04,8079.81 2313.04,8060.13 v1(2331.83,8041.34) 2351.66,8021.51 2351.66,7959.55 2361.4,7949.8 D32.7@2398.76,7949.8
$1N7611: C133.1 D18.1 R78.1 R124.2 | length 398.9
  Top Layer w19.68: v1(2335.77,8332.68) 2339.71,8336.61 R124.2@2390.89,8336.61
  Bottom Layer w13.78: C133.1@2168.45,8253.94 2168.45,8234.35 2216.33,8234.35 2235.92,8253.94 R78.1@2276.72,8253.94 2276.72,8255.91 2316.98,8296.17 2316.98,8313.89 v1(2335.77,8332.68) 2398.76,8332.68 2405.46,8339.37 D18.1@2405.46,8369.88
$1N7614: C134.1 D18.3 R79.1 R125.2 | length 343.4
  Top Layer w19.68: v1(2331.83,8438.98) 2355.46,8415.35 R125.2@2390.89,8415.35
  Bottom Layer w13.78: C134.1@2168.45,8381.89 R79.1@2276.72,8381.89 2276.72,8383.86 v1(2331.83,8438.98) 2362.74,8469.88 D18.3@2405.46,8469.88
$1N7623: D40.19 R176.2 | length 69.8
  Bottom Layer w9.84: D40.19@4227.5,7587.6 D40.19@4227.58,7587.52 ; D40.19@4227.58,7587.53 4256.96,7587.53 4263.92,7594.49 R176.2@4294.43,7594.49
$1N7624: C47.2 C48.2 D40.20 D41.20 FB1.1 R49.1 R50.1 | length 2191.5
  Top Layer w13.78: v1(4036.56,8572.83) 4070.02,8606.3 v1(4229.47,8606.3) ; v1(4296.4,7710.63) 4296.4,7735.24 4275.46,7756.18 4275.46,8052.53 4321.6,8098.67 4321.6,8169.69 v1(4260.97,8230.32) 4260.97,8234.65 4268.45,8234.65 4272.78,8230.32 v1(4347.58,8230.32)
  Top Layer w19.68: v1(4016.87,7403.54) 4035.66,7422.33 4035.66,7447.03 4137.84,7549.21 v1(4304.27,7549.21)
  Bottom Layer w13.78: R50.1@3993.25,8553.15 4025.73,8553.15 4036.56,8563.98 v1(4036.56,8572.83) ; D40.20@4227.5,7562.01 4262.87,7562.01 4275.67,7549.21 v1(4304.27,7549.21) 4346.6,7549.21 4365.3,7567.91 C48.2@4365.3,7608.27 4365.3,7673.58 4328.25,7710.63 v1(4296.4,7710.63) ; D41.20@4227.5,8644.68 4227.5,8608.27 v1(4229.47,8606.3) 4229.47,8581.69 4292.46,8518.7 4292.46,8482.28 C47.2@4304.27,8482.28 4260.97,8438.98 v1(4260.97,8230.32) ; v1(4347.58,8230.32) 4355.46,8238.19 FB1.1@4388.92,8238.19
  Bottom Layer w19.68: v1(4016.87,7403.54) 4018.84,7405.51 R49.1@4018.84,7446.85
$1N7634: D41.19 R177.2 | length 106.1
  Bottom Layer w13.78: D41.19@4227.5,8670.28 4271.79,8670.28 4314.12,8627.95 R177.2@4314.12,8625.98
$1N7635: D41.1 R50.2 | length 174.6
  Bottom Layer w9.84: R50.2@3926.32,8553.15 3951.36,8578.18 3958.88,8578.18 3964.36,8583.66 4003.44,8583.66 4022.84,8603.06 4022.84,8644.68 D41.1@4007.03,8644.68
$1N7644: D27.5 D41.11 | length 1641.7
  Bottom Layer w9.84: D41.11@4227.5,8875 4265.77,8875 4297.26,8843.5 5444.39,8843.5 5458.8,8857.92 5458.8,8878.3 5402.99,8934.11 5402.99,9096.16 5465.69,9158.86 D27.5@5507.03,9158.86
$1N7645: D27.4 D41.12 | length 1607.2
  Bottom Layer w9.84: D41.12@4227.5,8849.41 4269.09,8849.41 4290.74,8827.76 5450.91,8827.76 5474.55,8851.39 5474.55,8884.83 5418.74,8940.64 5418.74,9061.91 5465.69,9108.86 D27.4@5507.03,9108.86
$1N7646: D27.3 D41.13 | length 1572.7
  Bottom Layer w9.84: D41.13@4227.5,8823.82 4272.4,8823.82 4284.22,8812.01 5457.43,8812.01 5490.3,8844.87 5490.3,8891.35 5434.49,8947.16 5434.49,9027.65 5465.69,9058.86 D27.3@5507.03,9058.86
$1N7647: D27.2 D41.14 | length 1534.3
  Bottom Layer w9.84: D41.14@4227.5,8798.23 4270.59,8798.23 4272.56,8796.26 5463.96,8796.26 5506.05,8838.35 5506.05,8897.87 5454.92,8949 5454.92,8998.09 5465.69,9008.86 D27.2@5507.03,9008.86
$1N7648: D27.1 D41.15 | length 1452
  Bottom Layer w9.84: D41.15@4227.5,8772.64 4264.79,8772.64 4270.73,8778.58 5468.55,8778.58 5521.79,8831.83 5521.79,8904.39 5507.03,8919.16 D27.1@5507.03,8958.86
$1N7649: D26.6 D41.16 | length 2692.3
  Top Layer w13.78: v1(4371.2,7714.57) 4371.2,7741.14 4370.46,7741.89 4370.46,7823.2 4315.67,7877.99 4315.67,7920.48 4348.26,7953.07 4389.24,7953.07 v1(4406.64,7970.47)
  Bottom Layer w9.84: D26.6@3818.25,7399.61 3818.25,7358.27 3829.49,7347.03 3948.54,7347.03 3958.8,7357.28 4167.47,7357.28 4293.37,7231.39 4518.75,7231.39 4536.44,7249.07 4536.44,7602.62 4480.16,7658.9 4426.87,7658.9 v1(4371.2,7714.57) ; D41.16@4227.5,8747.05 4305.81,8747.05 4395.81,8657.05 4395.81,8387.77 4321.01,8312.96 4321.01,8195.01 4406.64,8109.38 v1(4406.64,7970.47)
$1N7650: D26.5 D41.17 | length 2660.6
  Top Layer w13.78: v1(4383.01,7891.73) 4383.01,7865.16 4406.64,7841.54 v1(4406.64,7714.57)
  Bottom Layer w9.84: D26.5@3768.25,7399.61 3768.25,7358.27 3805.11,7321.41 3945.19,7321.41 3965.32,7341.54 4160.95,7341.54 4286.84,7215.64 4525.28,7215.64 4552.19,7242.55 4552.19,7616.1 4490.74,7677.55 4443.65,7677.55 v1(4406.64,7714.57) ; D41.17@4227.5,8721.46 4305.19,8721.46 4380.06,8646.58 4380.06,8395.18 4305.26,8320.38 4305.26,8182.07 4365.26,8122.07 4365.26,7945.22 4383.01,7927.46 v1(4383.01,7891.73)
$1N7651: D26.4 D41.18 | length 2771.3
  Top Layer w13.78: v1(4347.58,7907.48) 4364.98,7924.88 4398.14,7924.88 4446.01,7877.01 v1(4446.01,7714.57)
  Bottom Layer w9.84: D26.4@3718.25,7399.61 3718.25,7358.27 3773.39,7303.13 3949.19,7303.13 3971.84,7325.79 4154.42,7325.79 4280.32,7199.89 4531.8,7199.89 4567.94,7236.03 4567.94,7622.62 4475.99,7714.57 v1(4446.01,7714.57) ; D41.18@4227.5,8695.87 4306.68,8695.87 4364.31,8638.23 4364.31,8401.7 4289.51,8326.9 4289.51,8175.55 4347.58,8117.48 v1(4347.58,7907.48)
$1N7652: D25.1 D40.18 | length 3306.9
  Top Layer w9.84: v1(3812.15,8954.72) 3889.8,8877.07 3889.8,8350.98 3978.9,8261.88 3978.9,8173.8 v1(4001.13,8151.57)
  Bottom Layer w9.84: v1(4001.13,8151.57) 4030.46,8122.24 4030.46,7841.61 4121.35,7750.71 4121.35,7687.66 4195.82,7613.19 D40.18@4227.5,7613.19
  Bottom Layer w13.78: D25.1@2461.56,9618.11 2461.56,9599.41 2555.02,9505.95 2774.48,9505.95 2890.1,9390.33 3383.66,9390.33 3419.36,9354.64 3419.36,9118.35 3582.98,8954.72 v1(3812.15,8954.72)
$1N7653: D25.2 D40.17 | length 3415.2
  Top Layer w9.84: v1(3812.15,8990.16) 3905.55,8896.75 3905.55,8357.5 3999.36,8263.69 3999.36,8188.77 v1(4036.56,8151.57)
  Bottom Layer w9.84: D25.2@2411.56,9618.11 2411.56,9667.19 2418.52,9674.15 2501.47,9674.15 2629.75,9545.87 2772.27,9545.87 2908.3,9409.83 3389.32,9409.83 3437.15,9362 3437.15,9130.94 3577.93,8990.16 v1(3812.15,8990.16) ; v1(4036.56,8151.57) 4046.21,8141.93 4046.21,7848.13 4137.1,7757.24 4137.1,7694.18 4192.5,7638.78 D40.17@4227.5,7638.78
$1N7654: D25.3 D40.16 | length 3485.2
  Top Layer w9.84: v1(3812.15,9025.59) 3921.3,8916.44 3921.3,8364.02 4028.68,8256.64 v1(4028.68,8226.38)
  Bottom Layer w9.84: D25.3@2361.56,9618.11 2361.56,9659.45 2392.01,9689.9 2507.99,9689.9 2636.28,9561.61 2778.79,9561.61 2914.82,9425.58 3395.84,9425.58 3452.9,9368.53 3452.9,9137.47 3582.22,9008.14 3794.7,9008.14 v1(3812.15,9025.59) ; v1(4028.68,8226.38) 4028.68,8196.78 4061.95,8163.51 4061.95,7854.66 4152.85,7763.76 4152.85,7700.7 4189.18,7664.37 D40.16@4227.5,7664.37
$1N7655: D25.4 D40.15 | length 3570.2
  Top Layer w9.84: v1(3812.15,9061.02) 3937.05,8936.12 3937.05,8370.55 4046.72,8260.88 4046.72,8247.71 v1(4064.12,8230.32)
  Bottom Layer w9.84: D25.4@2311.56,9618.11 2311.56,9668.45 2354.51,9711.41 2511.72,9711.41 2645.76,9577.36 2785.31,9577.36 2921.34,9441.33 3402.36,9441.33 3468.64,9375.05 3468.64,9143.99 3588.74,9023.89 3775.02,9023.89 v1(3812.15,9061.02) ; v1(4064.12,8230.32) 4064.12,8183.62 4079.18,8168.56 4079.18,7859.71 4168.6,7770.28 4168.6,7709.86 4188.5,7689.96 D40.15@4227.5,7689.96
$1N7656: D25.5 D40.14 | length 3653.1
  Top Layer w9.84: v1(3812.15,9100.39) 3952.8,8959.75 3952.8,8377.07 v1(4099.55,8230.32)
  Bottom Layer w9.84: D25.5@2261.56,9618.11 2261.56,9659.45 2332.06,9729.95 2515.44,9729.95 2652.28,9593.11 2791.83,9593.11 2927.87,9457.08 3408.89,9457.08 3484.39,9381.57 3484.39,9150.51 3595.27,9039.64 3751.39,9039.64 v1(3812.15,9100.39) ; v1(4099.55,8230.32) 4099.55,8205.71 4094.92,8201.08 4094.92,7866.23 4184.35,7776.81 4184.35,7716.38 4185.18,7715.55 D40.14@4227.5,7715.55
$1N7657: D26.1 D40.13 | length 1988.8
  Top Layer w19.68: v1(3568.05,7336.61) 3674.35,7336.61 v1(3697.98,7312.99)
  Bottom Layer w9.84: v1(3697.98,7312.99) 3722.58,7312.99 3750.51,7285.06 3953.39,7285.06 3978.36,7310.04 4147.9,7310.04 4273.8,7184.14 4538.32,7184.14 4583.68,7229.51 4583.68,7638.06 4480.6,7741.14 D40.13@4227.5,7741.14
  Bottom Layer w19.68: v1(3568.05,7336.61) 3568.25,7336.81 D26.1@3568.25,7399.61
$1N7658: D26.2 D40.12 | length 2022.7
  Top Layer w19.68: v1(3623.17,7297.24) 3642.86,7277.56 v1(3697.98,7277.56)
  Bottom Layer w9.84: v1(3697.98,7277.56) 3735.74,7277.56 3744.79,7268.51 3959.1,7268.51 3984.89,7294.29 4141.38,7294.29 4267.27,7168.4 4544.85,7168.4 4599.43,7222.98 4599.43,7645.63 4478.33,7766.73 D40.12@4227.5,7766.73
  Bottom Layer w19.68: D26.2@3618.25,7399.61 3618.25,7342.52 3623.17,7337.6 v1(3623.17,7297.24)
$1N7659: D26.3 D40.11 | length 2055.6
  Bottom Layer w9.84: D26.3@3668.25,7399.61 3668.25,7272.48 3688.8,7251.93 3964.8,7251.93 3991.41,7278.54 4134.86,7278.54 4260.75,7152.65 4551.37,7152.65 4615.58,7216.86 4615.58,7654.59 4477.85,7792.32 D40.11@4227.5,7792.32
$1N7660: D30.10 D33.9 J8.1 R48.1 | length 2534.7
  Top Layer w9.84: J8.1@2816.48,8848.43 2816.48,8888.78 2863.06,8935.36 3389.13,8935.36 3425.11,8899.38 3425.11,7941.18 3449.94,7916.34 v1(3449.94,7891.73) ; v1(3481.44,7726.38) 3498.84,7743.78 3499.25,7743.78 3525.7,7770.23 3780.11,7770.23 3814.12,7736.22 R48.1@3816.09,7736.22
  Bottom Layer w9.84: v1(3481.44,7726.38) 3482.42,7727.36 D33.9@3564.12,7727.36
  Bottom Layer w13.78: D30.10@2646.79,8934.06 2730.85,8934.06 J8.1@2816.48,8848.43 ; v1(3449.94,7891.73) 3449.94,7848.24 3481.44,7816.74 v1(3481.44,7726.38)
$1N7661: D30.12 D33.8 J7.1 R47.1 | length 2061
  Top Layer w9.84: J7.1@3170.81,8848.43 3263.08,8756.16 3352.16,8756.16 3405.34,8702.97 3405.34,7938.67 3410.57,7933.44 v1(3410.57,7891.73) ; v1(3509,7702.76) 3529.67,7723.43 3562.15,7723.43 R47.1@3562.15,7736.22
  Bottom Layer w9.84: v1(3410.57,7891.73) 3410.57,7854.32 3453.09,7811.81 3453.09,7719.93 3471.25,7701.77 3508.01,7701.77 v1(3509,7702.76)
  Bottom Layer w13.78: D30.12@2646.79,8834.06 2722.14,8834.06 2769.92,8786.27 3108.65,8786.27 J7.1@3170.81,8848.43 ; v1(3509,7702.76) 3509.98,7701.77 D33.8@3564.12,7701.77
$1N7662: D30.14 D33.7 J6.1 R46.1 | length 2137.7
  Top Layer w9.84: v1(3481.44,7675.2) 3483.41,7677.17 3524,7677.17 3540.12,7693.28 3778.31,7693.28 3814.12,7657.48 R46.1@3816.09,7657.48
  Top Layer w19.68: J6.1@3160.97,8612.2 3305.26,8467.92 3305.26,8371.46 3241.88,8308.08 3241.88,8039.1 3308.21,7972.77 v1(3308.21,7891.73)
  Bottom Layer w9.84: v1(3481.44,7675.2) 3482.42,7676.18 D33.7@3564.12,7676.18
  Bottom Layer w13.78: D30.14@2646.79,8734.06 3039.12,8734.06 J6.1@3160.97,8612.2 ; v1(3308.21,7891.73) 3327,7872.94 3327.53,7872.94 3433.89,7766.58 3433.89,7704.88 3463.57,7675.2 v1(3481.44,7675.2)
$1N7663: D30.16 D33.6 J5.1 R45.1 | length 1842.4
  Top Layer w9.84: v1(3512.94,7651.57) 3523.76,7651.57 3529.67,7657.48 R45.1@3562.15,7657.48
  Top Layer w19.68: J5.1@2816.48,8612.2 2816.48,8558.96 2826.22,8549.22 3179.09,8549.22 3266.51,8461.8 3266.51,8375.12 3208.68,8317.3 3208.68,7920.4 v1(3237.35,7891.73)
  Bottom Layer w9.84: v1(3237.35,7891.73) 3265.87,7891.73 3407.92,7749.68 3407.92,7689.67 3447,7650.59 3511.95,7650.59 v1(3512.94,7651.57)
  Bottom Layer w13.78: D30.16@2646.79,8634.06 2754.27,8634.06 2776.13,8612.2 J5.1@2816.48,8612.2 ; v1(3512.94,7651.57) 3513.92,7650.59 D33.6@3564.12,7650.59
$1N7664: D29.10 D33.5 J4.1 R44.1 | length 1278.2
  Top Layer w9.84: v1(3481.44,7624.02) 3482.42,7625 3777.7,7625 3814.12,7588.58 R44.1@3816.09,7588.58
  Bottom Layer w9.84: v1(3481.44,7624.02) 3481.44,7625 D33.5@3564.12,7625
  Bottom Layer w13.78: D29.10@2715.69,7487.2 2808.61,7487.2 2835.18,7460.63 J4.1@2875.53,7460.63 2962.92,7548.02 3329.13,7548.02 3405.13,7624.02 v1(3481.44,7624.02)
$1N7665: D29.12 D33.4 J3.1 R43.1 | length 991.8
  Top Layer w9.84: v1(3512.94,7600.39) 3550.34,7600.39 R43.1@3562.15,7588.58
  Bottom Layer w9.84: J3.1@3220.02,7460.63 3273.36,7513.97 3349.43,7513.97 3434.87,7599.41 3487.35,7599.41 3488.33,7600.39 v1(3512.94,7600.39)
  Bottom Layer w13.78: D29.12@2715.69,7387.2 3146.6,7387.2 J3.1@3220.02,7460.63 ; v1(3512.94,7600.39) 3512.94,7599.41 D33.4@3564.12,7599.41
$1N7666: D29.14 D33.3 J2.1 R42.1 | length 1402.8
  Top Layer w9.84: v1(3481.44,7572.83) 3482.42,7573.82 3524,7573.82 3543.69,7554.13 3779.67,7554.13 3814.12,7519.69 R42.1@3816.09,7519.69
  Bottom Layer w9.84: v1(3481.44,7572.83) 3482.42,7573.82 D33.3@3564.12,7573.82
  Bottom Layer w13.78: D29.14@2715.69,7287.2 2822.58,7287.2 J2.1@2875.53,7234.25 2954.63,7313.35 3250.34,7313.35 3369.32,7432.32 3369.32,7490.83 3451.32,7572.83 v1(3481.44,7572.83)
$1N7667: D29.16 D33.2 J1.1 R41.1 | length 1123.4
  Top Layer w13.78: v1(3512.94,7549.21) 3512.94,7536.42 3529.67,7519.69 R41.1@3562.15,7519.69
  Bottom Layer w13.78: D29.16@2715.69,7187.2 2756.05,7187.2 2766.31,7176.94 3172.56,7176.94 J1.1@3220.02,7224.41 3295.28,7299.66 3342.9,7299.66 3479.76,7436.52 3479.76,7516.03 v1(3512.94,7549.21) 3512.94,7548.23 D33.2@3564.12,7548.23
$1N7682: D40.1 R49.2 | length 53.1
  Bottom Layer w13.78: D40.1@4007.03,7562.01 4018.84,7550.2 R49.2@4018.84,7513.78
$1N7683: D8.4 D43.3 | length 395
  Bottom Layer w13.78: D43.3@2619.33,8154.23 2708.99,8154.23 2781.58,8081.64 2908.55,8081.64 2939.12,8112.2 D8.4@2971.6,8112.2
$1N7714: D18.8 R175.1 | length 111.7
  Bottom Layer w13.78: D18.8@2620.42,8369.88 2677.11,8369.88 2693.05,8385.83 R175.1@2725.53,8385.83
$1N7715: D18.6 R178.1 | length 111.4
  Bottom Layer w13.78: D18.6@2620.42,8469.88 2677.9,8469.88 2693.05,8454.72 R178.1@2725.53,8454.72
$1N7718: C1.2 C72.1 D43.1 FB9.2 | length 280.8
  Bottom Layer w13.78: D43.1@2619.33,8254.23 2668.17,8254.23 2688.15,8234.25 C1.2@2709.79,8234.25 2761.95,8234.25 2767.86,8240.16 C72.1@2808.21,8240.16 2850.53,8240.16 2856.44,8234.25 FB9.2@2886.95,8234.25
$1N7720: D33.1 R179.1 | length 66.4
  Bottom Layer w9.84: R179.1@3532.62,7470.47 3534.59,7470.47 3564.12,7500 D33.1@3564.12,7522.64
$1N7722: D7.4 D43.2 | length 475.9
  Bottom Layer w9.84: D43.2@2619.33,8204.23 2669.18,8204.23 2685.98,8187.43 2897.1,8187.43 2929.27,8219.61 2929.27,8238.32 2929.27,8318.9 2939.12,8328.74 D7.4@2971.6,8328.74
$1N7724: D34.1 R180.1 | length 48
  Bottom Layer w9.84: R180.1@3550.34,8582.68 3564.12,8596.46 D34.1@3564.12,8625
$1N7725: D42.6 R61.2 R175.2 S1.1 S1.2 | length 1271
  Top Layer w9.84: v1(2835.77,8387.8) 2851.77,8387.8 2868.66,8370.91 3163.37,8370.91 v1(3223.57,8431.1)
  Top Layer w19.68: v1(3524.75,8277.56) 3524.75,8252.95 3528.68,8249.02 v1(3528.68,8159.45)
  Bottom Layer w9.84: D42.6@3168.45,8354.33 3198.96,8354.33 3209.87,8343.42 3209.87,8271.32 3243.68,8237.51 3484.69,8237.51 v1(3524.75,8277.56)
  Bottom Layer w13.78: R175.2@2792.46,8385.83 2833.8,8385.83 v1(2835.77,8387.8) ; D42.6@3168.45,8354.33 3168.45,8380.41 3182.23,8394.19 R61.2@3182.23,8431.1 v1(3223.57,8431.1) ; v1(3524.75,8277.56) 3527.5,8280.32 S1.1@3527.5,8326.77
  Bottom Layer w19.68: S1.2@3527.5,8110.24 3527.5,8158.27 v1(3528.68,8159.45)
$1N7731: D42.3 R80.2 R181.2 | length 381.3
  Top Layer w19.68: v1(3280.65,8179.13) 3330.18,8228.66 3330.18,8266.07 v1(3347.58,8283.46)
  Bottom Layer w13.78: D42.3@3274.75,8279.53 3319.04,8279.53 3322.98,8283.46 v1(3347.58,8283.46) 3347.58,8283.64 3348.43,8284.49 3348.43,8322.34 3373.73,8347.64 3373.73,8366.7 R181.2@3398.76,8391.73
  Bottom Layer w19.68: R80.2@3235.38,8179.13 v1(3280.65,8179.13)
$1N7734: D42.1 R83.2 R182.2 | length 137.5
  Bottom Layer w13.78: D42.1@3274.75,8354.33 3274.75,8380.41 3270.81,8384.35 R83.2@3270.81,8431.1 R182.2@3329.87,8431.1
$1N7735: FB8.2 R242.2 | length 70.9
  Bottom Layer w13.78: FB8.2@3570.02,7913.39 R242.2@3640.89,7913.39
$1N7736: C2.2 C3.2 C4.2 C5.2 C6.2 C7.2 C45.2 C46.2 C73.1 C74.1 D7.5 D8.5 D33.20 D34.20 D42.5 R41.2 R42.2 R43.2 R44.2 R45.2 R46.2 R47.2 R48.2 R51.2 R52.2 R53.2 R54.2 R55.2 R56.2 R57.2 R58.2 R59.2 R60.2 R61.1 R80.1 R81.2 R82.2 R83.1 R242.1 | length 5260.9
  Top Layer w9.84: v1(3449.94,8379.92) 3524.51,8379.92 3566.73,8422.14 3566.73,8562 3581.5,8576.77 C7.2@3713.72,8576.77 3713.72,8616.41 3717.66,8620.35 3717.66,8622.05
  Top Layer w19.68: v1(3032.62,8505.91) 3075.93,8462.6 v1(3144.83,8462.6) ; R41.2@3629.08,7519.69 v1@3692.07,7519.69 ; R43.2@3629.08,7588.58 v1(3701.91,7588.58) R44.2@3749.16,7588.58 ; R45.2@3629.08,7657.48 3668.45,7657.48 3670.42,7659.45 v1(3701.91,7659.45) 3703.88,7657.48 R46.2@3749.16,7657.48 ; R47.2@3629.08,7736.22 3668.45,7736.22 3670.42,7738.19 v1(3701.91,7738.19) 3703.88,7736.22 R48.2@3749.16,7736.22 ; R51.2@3638.92,8622.05 3717.66,8622.05 R52.2@3759,8622.05 ; R53.2@3638.92,8690.94 3686.16,8690.94 3688.13,8692.91 v1(3717.66,8692.91) 3719.63,8690.94 R54.2@3759,8690.94 ; R55.2@3638.92,8759.84 v1(3717.66,8759.84) R56.2@3759,8759.84 ; R57.2@3638.92,8828.74 3681.24,8828.74 3683.21,8830.71 v1(3717.66,8830.71) 3719.63,8828.74 R58.2@3759,8828.74 ; C5.2@3684.2,7474.41 3684.2,7511.81 v1@3692.07,7519.69 ; C7.2@3713.72,8576.77 3751.13,8576.77 3753.09,8578.74 v1(3784.59,8578.74) ; R42.2@3749.16,7519.69 3703.88,7519.69 v1(3701.91,7521.65) 3694.04,7521.65 v1@3692.07,7519.69
  Bottom Layer w9.84: v1(3144.83,8462.6) 3144.83,8437.99 3132.37,8425.53 3132.37,8330.73 3146.16,8316.93 3159.59,8316.93 3130.85,8288.19 3130.85,8235.31 3156.51,8209.65 3156.51,8179.13 R80.1@3168.45,8179.13 ; D33.20@3784.59,7522.64 3786.99,7525.03 3822.55,7525.03 3853.49,7494.09 C73.1@3853.49,7490.16 ; D34.20@3784.59,8625 3826.91,8625 3826.91,8622.05 C74.1@3863.33,8622.05
  Bottom Layer w13.78: C2.2@2900.73,8139.76 2932.42,8171.45 2934.39,8171.45 2934.45,8171.51 2942.93,8171.51 2958.42,8187.01 D8.5@2971.6,8187.01 2971.6,8209.65 2961.76,8219.49 R82.2@2961.76,8257.87 3018.29,8314.4 3018.29,8356.86 D7.5@2971.6,8403.54 2971.6,8422.87 2982.55,8433.83 2982.55,8434.06 2991.28,8442.78 R81.2@2991.28,8464.57 C3.2@2920.42,8464.57 ; v1(3144.83,8462.6) 3148.76,8462.6 3182.23,8496.06 R61.1@3182.23,8498.03 R83.1@3270.81,8498.03 ; D42.5@3159.59,8316.93 D42.5@3168.45,8316.93 ; R80.1@3168.45,8179.13 3208.37,8139.21 3208.37,8131.33 C45.2@3239.31,8100.39 3239.31,8129.23 3315.67,8129.23 3375.73,8189.29 3573.05,8189.29 3577,8189.29 ; v1(3449.94,8379.92) 3479.47,8379.92 3480.02,8380.47 3567.5,8380.47 3603.22,8344.75 3603.22,8219.47 3577,8193.24 3577,8189.29 ; C46.2@3633.01,7824.8 3642.86,7814.96 R60.2@3699.94,7814.96 ; C4.2@3723.57,8586.61 3723.57,8619.09 3720.61,8619.09 3717.66,8622.05 ; D33.20@3784.59,7522.64 3707.82,7522.64 3706.83,7521.65 v1(3701.91,7521.65) v1(3701.91,7588.58) v1(3701.91,7659.45) v1(3701.91,7738.19) 3701.91,7772.64 3699.94,7774.61 R60.2@3699.94,7814.96 ; D34.20@3784.59,8625 3742.27,8625 3739.31,8622.05 3717.66,8622.05 ; R59.2@3881.05,8950.79 3860.38,8950.79 3817.07,8907.48 C6.2@3717.66,8907.48 v1(3717.66,8830.71) v1(3717.66,8759.84) v1(3717.66,8692.91) 3717.66,8622.05 ; 3577,8189.29 3602.86,8163.43 3602.86,8073.6 3707.82,7968.65 R242.1@3707.82,7913.39 3707.82,7868.11 3699.94,7860.24 R60.2@3699.94,7814.96
  Bottom Layer w19.68: R81.2@2991.28,8464.57 2993.25,8464.57 3032.62,8503.94 v1(3032.62,8505.91) ; C4.2@3723.57,8586.61 3776.72,8586.61 v1(3784.59,8578.74)
$1N9195: D43.7 R183.2 | length 471.7
  Top Layer w19.68: v1(2020.81,8206.69) 2052.31,8238.2 2319.03,8238.2 2326.91,8230.31 v1(2351.52,8230.32)
  Bottom Layer w19.68: R183.2@2001.13,8163.39 2001.13,8187.01 v1(2020.81,8206.69) ; v1(2351.52,8230.32) 2351.52,8218.11 2365.4,8204.23 D43.7@2406.74,8204.23
$1N9206: D43.6 R184.2 | length 404.7
  Top Layer w19.68: v1(2071.99,8206.69) 2103.49,8175.2 v1(2351.52,8175.2)
  Bottom Layer w13.78: R184.2@2070.02,8163.39 2070.02,8204.72 v1(2071.99,8206.69) ; v1(2351.52,8175.2) 2351.52,8168.11 2365.4,8154.23 D43.6@2406.74,8154.23
$1N9254: KW1.1 X21.21 | length 258.3
  Top Layer w19.68: KW1.1@1646.79,8336.61 1685.34,8375.16 1834.62,8375.16 X21.21@1873.17,8336.61
$1N9261: KW2.1 X21.22 | length 251.5
  Top Layer w19.68: KW2.1@1646.79,8435.04 1712.62,8435.04 1733.06,8455.48 1833.05,8455.48 X21.22@1873.17,8415.35
$1N9268: KW3.1 X21.23 | length 242.7
  Top Layer w19.68: KW3.1@1646.79,8533.46 1833.8,8533.46 X21.23@1873.17,8494.09
$2N7540: K1.12 K1.22 | length 318.6
  Top Layer w59.06: K1.12@2751.19,11047.82 2842.43,11139.07 K1.22@3032.01,11139.07
$2N8046: K2.12 K2.22 | length 309.4
  Top Layer w59.06: K2.12@1793.55,10495.11 1971.26,10672.81 K2.22@2029.37,10672.81
$2N8048: K3.12 K3.22 | length 318.1
  Top Layer w59.06: K3.12@1008.93,9454.96 1008.93,9577.04 K3.22@1147.56,9715.67
$2N8053: K4.12 K4.22 | length 309.4
  Top Layer w59.06: K4.12@722.56,8402.72 722.56,8654.03 K4.22@763.66,8695.12
$2N8058: K5.12 K5.22 | length 318.5
  Top Layer w59.06: K5.22@804.42,7407.37 803.57,7349.5 803.57,7212.18 K5.12@890.75,7125
$2N8063: K6.12 K6.22 | length 309.4
  Top Layer w59.06: K6.22@1286.61,6377.32 1464.31,6199.62 K6.12@1464.31,6141.5
$2N8068: K7.12 K7.22 | length 318.1
  Top Layer w59.06: K7.22@2226.73,5514.22 2365.35,5375.59 K7.12@2487.44,5375.59
$2N8073: K8.12 K8.22 | length 308
  Top Layer w59.06: K8.22@3277.86,5127.86 3313.84,5091.87 K8.12@3570.93,5091.87
$2N8078: K9.12 K9.22 | length 318.3
  Top Layer w59.06: K9.22@4567.43,5173.87 4571.15,5175.31 4758.44,5175.31 K9.12@4848.25,5265.12
$2N8083: K10.12 K10.22 | length 308
  Top Layer w59.06: K10.22@5576.83,5656.74 5758.62,5838.53 K10.12@5809.51,5838.53
$2N8088: K11.12 K11.22 | length 316.9
  Top Layer w59.06: K11.22@6421.67,6563.65 6569.3,6711.29 K11.12@6569.3,6819.37
$2N8093: K12.12 K12.22 | length 309.4
  Top Layer w59.06: K12.22@6824.13,7636.38 6865.23,7677.47 K12.12@6865.23,7928.78
$2N8098: K13.12 K13.22 | length 326
  Top Layer w59.06: K13.12@6688.66,9193.9 6734.05,9157.99 6784.47,9107.57 6784.47,8968.62 K13.22@6774.99,8911.53
$2N8103: K14.12 K14.22 | length 309.4
  Top Layer w59.06: K14.12@6123.84,10159.45 6301.55,9981.75 K14.22@6301.55,9923.64
$2N8108: K15.12 K15.22 | length 318.1
  Top Layer w59.06: K15.12@5147.03,10913.45 5285.65,10774.83 K15.22@5407.74,10774.83
$2N8113: K16.12 K16.22 | length 308
  Bottom Layer w59.06: K16.12@4011.24,11229.78 4047.22,11193.79 K16.22@4304.31,11193.79